# Altium PCB 1SL1 Xilinx Spartan-11E PQ208.PcbDoc (part 4 of 5)
Units mil, origin at the board's own origin, x right, y up, seen from the top; angles counter-clockwise.
Board outline 7086.61 x 1988.19 mil, 2 copper layers (Top Layer, Bottom Layer), stack 29.698 mil thick; 115 components, 126 nets, 642 pads, 225 vias.
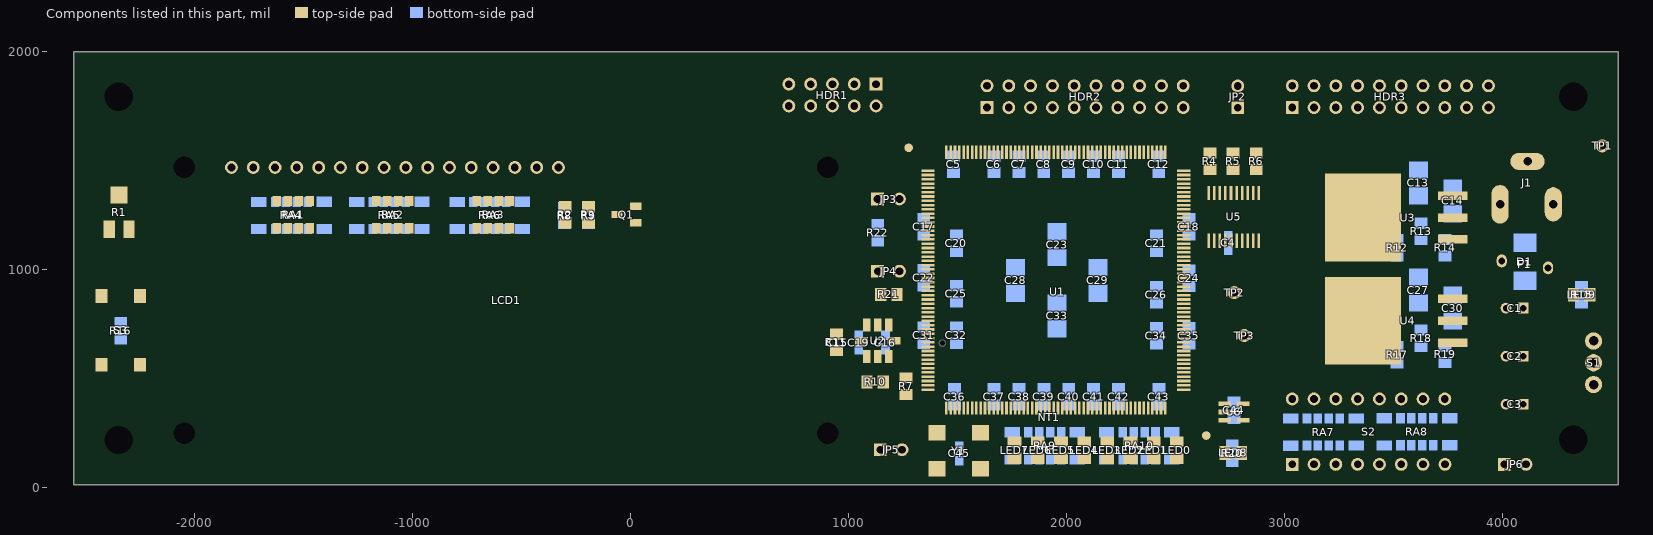
[diagram p3: the components of this part, seen from the top]

## Silkscreen, mask and mechanical layers (free items; w line width, h text height) (continued)
19_FABRICATION_NOTES:
  text "N" at 5217.99,-898.88 h2.83
  text "O" at 5219.56,-898.88 h2.83
  text "T" at 5221.13,-898.88 h2.83
  text "E" at 5222.25,-898.88 h2.83
  text "S" at 5223.37,-898.88 h2.83
  text "U" at 5224.94,-898.88 h2.83
  text "N" at 5226.51,-898.88 h2.83
  text "L" at 5228.07,-898.88 h2.83
  text "E" at 5229.2,-898.88 h2.83
  text "S" at 5230.32,-898.88 h2.83
  text "S" at 5231.44,-898.88 h2.83
  text "O" at 5233,-898.88 h2.83
  text "T" at 5234.57,-898.88 h2.83
  text "H" at 5235.69,-898.88 h2.83
  text "E" at 5237.26,-898.88 h2.83
  text "R" at 5238.38,-898.88 h2.83
  text "W" at 5239.73,-898.88 h2.83
  text "I" at 5241.97,-898.88 h2.83
  text "S" at 5242.64,-898.88 h2.83
  text "E" at 5243.76,-898.88 h2.83
  text "S" at 5245.33,-898.88 h2.83
  text "P" at 5246.45,-898.88 h2.83
  text "E" at 5247.79,-898.88 h2.83
  text "C" at 5248.91,-898.88 h2.83
  text "I" at 5250.26,-898.88 h2.83
  text "F" at 5250.93,-898.88 h2.83
  text "I" at 5252.05,-898.88 h2.83
  text "E" at 5252.72,-898.88 h2.83
  text "D" at 5253.84,-898.88 h2.83
  text ":" at 5255.41,-898.88 h2.83
  text "1" at 5220.01,-902.69 h2.83
  text "A" at 5224.49,-904.04 h2.83
  text "L" at 5225.83,-904.04 h2.83
  text "L" at 5226.95,-904.04 h2.83
  text "H" at 5228.52,-904.04 h2.83
  text "O" at 5230.09,-904.04 h2.83
  text "L" at 5231.66,-904.04 h2.83
  text "E" at 5232.78,-904.04 h2.83
  text "S" at 5233.9,-904.04 h2.83
  text "F" at 5235.47,-904.04 h2.83
  text "I" at 5236.59,-904.04 h2.83
  text "N" at 5237.26,-904.04 h2.83
  text "I" at 5238.83,-904.04 h2.83
  text "S" at 5239.5,-904.04 h2.83
  text "H" at 5240.62,-904.04 h2.83
  text "E" at 5242.19,-904.04 h2.83
  text "D" at 5243.31,-904.04 h2.83
  text "S" at 5245.32,-904.04 h2.83
  text "I" at 5246.44,-904.04 h2.83
  text "Z" at 5247.12,-904.04 h2.83
  text "E" at 5248.24,-904.04 h2.83
  text "A" at 5249.8,-904.04 h2.83
  text "S" at 5251.15,-904.04 h2.83
  text "S" at 5252.72,-904.04 h2.83
  text "H" at 5253.84,-904.04 h2.83
  text "O" at 5255.41,-904.04 h2.83
  text "W" at 5256.97,-904.04 h2.83
  text "N" at 5259.21,-904.04 h2.83
  text "." at 5260.78,-904.04 h2.83
  text "2" at 5220.01,-908.29 h2.83
  text "M" at 5224.49,-907.85 h2.83
  text "A" at 5226.5,-907.85 h2.83
  text "T" at 5227.85,-907.85 h2.83
  text "E" at 5228.97,-907.85 h2.83
  text "R" at 5230.09,-907.85 h2.83
  text "I" at 5231.43,-907.85 h2.83
  text "A" at 5232.1,-907.85 h2.83
  text "L" at 5233.45,-907.85 h2.83
  text ":" at 5234.57,-907.85 h2.83
  text "0" at 5235.69,-907.85 h2.83
  text "." at 5237.03,-907.85 h2.83
  text "0" at 5237.71,-907.85 h2.83
  text "6" at 5239.05,-907.85 h2.83
  text "2" at 5240.39,-907.85 h2.83
  text "I" at 5242.19,-907.85 h2.83
  text "N" at 5242.86,-907.85 h2.83
  text "F" at 5244.88,-907.85 h2.83
  text "I" at 5246,-907.85 h2.83
  text "B" at 5246.67,-907.85 h2.83
  text "E" at 5248.01,-907.85 h2.83
  text "R" at 5249.13,-907.85 h2.83
  text "G" at 5250.48,-907.85 h2.83
  text "L" at 5252.05,-907.85 h2.83
  text "A" at 5253.17,-907.85 h2.83
  text "S" at 5254.51,-907.85 h2.83
  text "S" at 5255.63,-907.85 h2.83
  text "R" at 5257.2,-907.85 h2.83
  text "E" at 5258.54,-907.85 h2.83
  text "I" at 5259.66,-907.85 h2.83
  text "N" at 5260.33,-907.85 h2.83
  text "F" at 5261.9,-907.85 h2.83
  text "O" at 5263.02,-907.85 h2.83
  text "R" at 5264.59,-907.85 h2.83
  text "C" at 5265.94,-907.85 h2.83
  text "E" at 5267.28,-907.85 h2.83
  text "D" at 5268.4,-907.85 h2.83
  text "E" at 5270.42,-907.85 h2.83
  text "P" at 5271.54,-907.85 h2.83
  text "O" at 5272.88,-907.85 h2.83
  text "X" at 5274.45,-907.85 h2.83
  text "Y" at 5275.79,-907.85 h2.83
  text "," at 5276.91,-907.85 h2.83
  text "N" at 5224.49,-911.21 h2.83
  text "E" at 5226.06,-911.21 h2.83
  text "M" at 5227.18,-911.21 h2.83
  text "A" at 5229.19,-911.21 h2.83
  text "G" at 5230.98,-911.21 h2.83
  text "R" at 5232.55,-911.21 h2.83
  text "A" at 5233.9,-911.21 h2.83
  text "D" at 5235.24,-911.21 h2.83
  text "E" at 5236.81,-911.21 h2.83
  text "F" at 5238.38,-911.21 h2.83
  text "R" at 5239.5,-911.21 h2.83
  text "-" at 5240.84,-911.21 h2.83
  text "4" at 5241.51,-911.21 h2.83
  text "," at 5242.86,-911.21 h2.83
  text "N" at 5243.98,-911.21 h2.83
  text "A" at 5245.55,-911.21 h2.83
  text "T" at 5246.89,-911.21 h2.83
  text "U" at 5248.01,-911.21 h2.83
  text "R" at 5249.58,-911.21 h2.83
  text "A" at 5250.92,-911.21 h2.83
  text "L" at 5252.27,-911.21 h2.83
  text "C" at 5253.84,-911.21 h2.83
  text "O" at 5255.18,-911.21 h2.83
  text "L" at 5256.75,-911.21 h2.83
  text "O" at 5257.87,-911.21 h2.83
  text "R" at 5259.44,-911.21 h2.83
  text "W" at 5261.23,-911.21 h2.83
  text "I" at 5263.47,-911.21 h2.83
  text "T" at 5264.14,-911.21 h2.83
  text "H" at 5265.26,-911.21 h2.83
  text "O" at 5266.83,-911.21 h2.83
  text "U" at 5268.4,-911.21 h2.83
  text "T" at 5269.97,-911.21 h2.83
  text "O" at 5224.49,-914.57 h2.83
  text "P" at 5226.06,-914.57 h2.83
  text "A" at 5227.4,-914.57 h2.83
  text "Q" at 5228.74,-914.57 h2.83
  text "U" at 5230.31,-914.57 h2.83
  text "E" at 5231.88,-914.57 h2.83
  text "R" at 5233,-914.57 h2.83
  text ";" at 5234.35,-914.57 h2.83
  text "1" at 5235.47,-914.57 h2.83
  text "O" at 5237.26,-914.57 h2.83
  text "Z" at 5238.83,-914.57 h2.83
  text "C" at 5240.39,-914.57 h2.83
  text "O" at 5241.74,-914.57 h2.83
  text "P" at 5243.31,-914.57 h2.83
  text "P" at 5244.65,-914.57 h2.83
  text "E" at 5246,-914.57 h2.83
  text "R" at 5247.12,-914.57 h2.83
  text "C" at 5248.91,-914.57 h2.83
  text "L" at 5250.25,-914.57 h2.83
  text "A" at 5251.37,-914.57 h2.83
  text "D" at 5252.72,-914.57 h2.83
  text "O" at 5254.73,-914.57 h2.83
  text "U" at 5256.3,-914.57 h2.83
  text "T" at 5257.87,-914.57 h2.83
  text "E" at 5258.99,-914.57 h2.83
  text "R" at 5260.11,-914.57 h2.83
  text "L" at 5261.9,-914.57 h2.83
  text "A" at 5263.02,-914.57 h2.83
  text "Y" at 5264.37,-914.57 h2.83
  text "E" at 5265.49,-914.57 h2.83
  text "R" at 5266.61,-914.57 h2.83
  text "S" at 5267.95,-914.57 h2.83
  text "." at 5269.07,-914.57 h2.83
  text "T" at 5270.19,-914.57 h2.83
  text "H" at 5271.31,-914.57 h2.83
  text "E" at 5272.88,-914.57 h2.83
  text "P" at 5224.49,-917.93 h2.83
  text "R" at 5225.83,-917.93 h2.83
  text "I" at 5227.18,-917.93 h2.83
  text "N" at 5227.85,-917.93 h2.83
  text "T" at 5229.42,-917.93 h2.83
  text "E" at 5230.54,-917.93 h2.83
  text "D" at 5231.66,-917.93 h2.83
  text "W" at 5233.67,-917.93 h2.83
  text "I" at 5235.91,-917.93 h2.83
  text "R" at 5236.59,-917.93 h2.83
  text "I" at 5237.93,-917.93 h2.83
  text "N" at 5238.6,-917.93 h2.83
  text "G" at 5240.17,-917.93 h2.83
  text "B" at 5242.19,-917.93 h2.83
  text "O" at 5243.53,-917.93 h2.83
  text "A" at 5245.1,-917.93 h2.83
  text "R" at 5246.44,-917.93 h2.83
  text "D" at 5247.79,-917.93 h2.83
  text "M" at 5249.8,-917.93 h2.83
  text "A" at 5251.82,-917.93 h2.83
  text "T" at 5253.17,-917.93 h2.83
  text "E" at 5254.29,-917.93 h2.83
  text "R" at 5255.41,-917.93 h2.83
  text "I" at 5256.75,-917.93 h2.83
  text "A" at 5257.42,-917.93 h2.83
  text "L" at 5258.77,-917.93 h2.83
  text "M" at 5260.33,-917.93 h2.83
  text "U" at 5262.35,-917.93 h2.83
  text "S" at 5263.92,-917.93 h2.83
  text "T" at 5265.04,-917.93 h2.83
  text "H" at 5266.61,-917.93 h2.83
  text "A" at 5268.18,-917.93 h2.83
  text "V" at 5269.52,-917.93 h2.83
  text "E" at 5270.87,-917.93 h2.83
  text "A" at 5272.43,-917.93 h2.83
  text "C" at 5224.49,-921.29 h2.83
  text "P" at 5225.83,-921.29 h2.83
  text "M" at 5227.18,-921.29 h2.83
  text "P" at 5229.19,-921.29 h2.83
  text "A" at 5230.54,-921.29 h2.83
  text "R" at 5231.88,-921.29 h2.83
  text "A" at 5233.22,-921.29 h2.83
  text "T" at 5234.57,-921.29 h2.83
  text "I" at 5235.69,-921.29 h2.83
  text "V" at 5236.36,-921.29 h2.83
  text "E" at 5237.71,-921.29 h2.83
  text "T" at 5239.27,-921.29 h2.83
  text "R" at 5240.39,-921.29 h2.83
  text "A" at 5241.74,-921.29 h2.83
  text "C" at 5243.08,-921.29 h2.83
  text "K" at 5244.43,-921.29 h2.83
  text "I" at 5245.77,-921.29 h2.83
  text "N" at 5246.44,-921.29 h2.83
  text "G" at 5248.01,-921.29 h2.83
  text "I" at 5250.03,-921.29 h2.83
  text "N" at 5250.7,-921.29 h2.83
  text "D" at 5252.27,-921.29 h2.83
  text "E" at 5253.84,-921.29 h2.83
  text "X" at 5254.96,-921.29 h2.83
  text "(" at 5256.75,-921.29 h2.83
  text "C" at 5257.42,-921.29 h2.83
  text "T" at 5258.77,-921.29 h2.83
  text "I" at 5259.89,-921.29 h2.83
  text ")" at 5260.56,-921.29 h2.83
  text "O" at 5261.68,-921.29 h2.83
  text "F" at 5263.25,-921.29 h2.83
  text "A" at 5264.82,-921.29 h2.83
  text "T" at 5266.16,-921.29 h2.83
  text "L" at 5267.73,-921.29 h2.83
  text "E" at 5268.85,-921.29 h2.83
  text "A" at 5269.97,-921.29 h2.83
  text "S" at 5271.31,-921.29 h2.83
  text "T" at 5272.43,-921.29 h2.83
  text "1" at 5274,-921.29 h2.83
  text "7" at 5275.35,-921.29 h2.83
  text "5" at 5276.69,-921.29 h2.83
  text "A" at 5224.49,-924.65 h2.83
  text "N" at 5225.83,-924.65 h2.83
  text "D" at 5227.4,-924.65 h2.83
  text "A" at 5229.42,-924.65 h2.83
  text "U" at 5231.21,-924.65 h2.83
  text "L" at 5232.78,-924.65 h2.83
  text "9" at 5234.35,-924.65 h2.83
  text "4" at 5235.69,-924.65 h2.83
  text "V" at 5237.03,-924.65 h2.83
  text "0" at 5238.38,-924.65 h2.83
  text "F" at 5240.17,-924.65 h2.83
  text "L" at 5241.29,-924.65 h2.83
  text "A" at 5242.41,-924.65 h2.83
  text "M" at 5243.76,-924.65 h2.83
  text "M" at 5245.77,-924.65 h2.83
  text "A" at 5247.79,-924.65 h2.83
  text "B" at 5249.13,-924.65 h2.83
  text "I" at 5250.48,-924.65 h2.83
  text "L" at 5251.15,-924.65 h2.83
  text "I" at 5252.27,-924.65 h2.83
  text "T" at 5252.94,-924.65 h2.83
  text "Y" at 5254.06,-924.65 h2.83
  text "R" at 5255.63,-924.65 h2.83
  text "A" at 5256.97,-924.65 h2.83
  text "T" at 5258.32,-924.65 h2.83
  text "I" at 5259.44,-924.65 h2.83
  text "N" at 5260.11,-924.65 h2.83
  text "G" at 5261.68,-924.65 h2.83
  text "." at 5263.25,-924.65 h2.83
  text "3" at 5220.01,-928.91 h2.83
  text "F" at 5224.49,-930.25 h2.83
  text "I" at 5225.61,-930.25 h2.83
  text "N" at 5226.28,-930.25 h2.83
  text "I" at 5227.85,-930.25 h2.83
  text "S" at 5228.52,-930.25 h2.83
  text "H" at 5229.64,-930.25 h2.83
  text ":" at 5231.21,-930.25 h2.83
  text "E" at 5232.33,-930.25 h2.83
  text "N" at 5233.45,-930.25 h2.83
  text "I" at 5235.02,-930.25 h2.83
  text "G" at 5235.69,-930.25 h2.83
  text "P" at 5237.71,-930.25 h2.83
  text "E" at 5239.05,-930.25 h2.83
  text "R" at 5240.17,-930.25 h2.83
  text "I" at 5241.96,-930.25 h2.83
  text "P" at 5242.64,-930.25 h2.83
  text "C" at 5243.98,-930.25 h2.83
  text "-" at 5245.32,-930.25 h2.83
  text "4" at 5246,-930.25 h2.83
  text "5" at 5247.34,-930.25 h2.83
  text "5" at 5248.68,-930.25 h2.83
  text "2" at 5250.03,-930.25 h2.83
  text "." at 5251.37,-930.25 h2.83
  text "A" at 5224.49,-934.06 h2.83
  text "P" at 5225.83,-934.06 h2.83
  text "P" at 5227.18,-934.06 h2.83
  text "L" at 5228.52,-934.06 h2.83
  text "Y" at 5229.64,-934.06 h2.83
  text "G" at 5231.21,-934.06 h2.83
  text "R" at 5232.78,-934.06 h2.83
  text "E" at 5234.12,-934.06 h2.83
  text "E" at 5235.24,-934.06 h2.83
  text "N" at 5236.36,-934.06 h2.83
  text "S" at 5238.38,-934.06 h2.83
  text "O" at 5239.5,-934.06 h2.83
  text "L" at 5241.07,-934.06 h2.83
  text "D" at 5242.19,-934.06 h2.83
  text "E" at 5243.76,-934.06 h2.83
  text "R" at 5244.88,-934.06 h2.83
  text "M" at 5246.67,-934.06 h2.83
  text "A" at 5248.68,-934.06 h2.83
  text "S" at 5250.03,-934.06 h2.83
  text "K" at 5251.15,-934.06 h2.83
  text "O" at 5252.94,-934.06 h2.83
  text "V" at 5254.51,-934.06 h2.83
  text "E" at 5255.85,-934.06 h2.83
  text "R" at 5256.97,-934.06 h2.83
  text "B" at 5258.77,-934.06 h2.83
  text "A" at 5260.11,-934.06 h2.83
  text "R" at 5261.46,-934.06 h2.83
  text "E" at 5262.8,-934.06 h2.83
  text "C" at 5264.37,-934.06 h2.83
  text "O" at 5265.71,-934.06 h2.83
  text "P" at 5267.28,-934.06 h2.83
  text "P" at 5268.62,-934.06 h2.83
  text "E" at 5269.97,-934.06 h2.83
  text "R" at 5271.09,-934.06 h2.83
  text "(" at 5272.88,-934.06 h2.83
  text "B" at 5273.55,-934.06 h2.83
  text "O" at 5274.9,-934.06 h2.83
  text "T" at 5276.47,-934.06 h2.83
  text "H" at 5277.59,-934.06 h2.83
  text "4" at 5220.01,-934.51 h2.83
  text "S" at 5224.49,-937.42 h2.83
  text "I" at 5225.61,-937.42 h2.83
  text "D" at 5226.28,-937.42 h2.83
  text "E" at 5227.85,-937.42 h2.83
  text "S" at 5228.97,-937.42 h2.83
  text ")" at 5230.09,-937.42 h2.83
  text "." at 5230.76,-937.42 h2.83
  text "T" at 5224.49,-941.23 h2.83
  text "O" at 5225.61,-941.23 h2.83
  text "B" at 5227.62,-941.23 h2.83
  text "E" at 5228.97,-941.23 h2.83
  text "S" at 5230.54,-941.23 h2.83
  text "I" at 5231.66,-941.23 h2.83
  text "L" at 5232.33,-941.23 h2.83
  text "K" at 5233.45,-941.23 h2.83
  text "S" at 5234.79,-941.23 h2.83
  text "C" at 5235.91,-941.23 h2.83
  text "R" at 5237.26,-941.23 h2.83
  text "E" at 5238.6,-941.23 h2.83
  text "E" at 5239.72,-941.23 h2.83
  text "N" at 5240.84,-941.23 h2.83
  text "E" at 5242.41,-941.23 h2.83
  text "D" at 5243.53,-941.23 h2.83
  text "W" at 5245.55,-941.23 h2.83
  text "H" at 5247.79,-941.23 h2.83
  text "I" at 5249.36,-941.23 h2.83
  text "T" at 5250.03,-941.23 h2.83
  text "E" at 5251.15,-941.23 h2.83
  text "O" at 5252.72,-941.23 h2.83
  text "N" at 5254.29,-941.23 h2.83
  text "(" at 5256.3,-941.23 h2.83
  text "B" at 5256.97,-941.23 h2.83
  text "O" at 5258.32,-941.23 h2.83
  text "T" at 5259.89,-941.23 h2.83
  text "H" at 5261.01,-941.23 h2.83
  text "S" at 5263.02,-941.23 h2.83
  text "I" at 5264.14,-941.23 h2.83
  text "D" at 5264.82,-941.23 h2.83
  text "E" at 5266.38,-941.23 h2.83
  text "S" at 5267.5,-941.23 h2.83
  text ")" at 5268.62,-941.23 h2.83
  text "P" at 5269.75,-941.23 h2.83
  text "E" at 5271.09,-941.23 h2.83
  text "R" at 5272.21,-941.23 h2.83
  text "5" at 5220.01,-941.68 h2.83
  text "\"" at 5224.49,-944.59 h2.83
  text "S" at 5225.38,-944.59 h2.83
  text "I" at 5226.5,-944.59 h2.83
  text "L" at 5227.18,-944.59 h2.83
  text "K" at 5228.3,-944.59 h2.83
  text "S" at 5229.64,-944.59 h2.83
  text "C" at 5230.76,-944.59 h2.83
  text "R" at 5232.1,-944.59 h2.83
  text "E" at 5233.45,-944.59 h2.83
  text "E" at 5234.57,-944.59 h2.83
  text "N" at 5235.69,-944.59 h2.83
  text "\"" at 5237.26,-944.59 h2.83
  text "A" at 5238.6,-944.59 h2.83
  text "R" at 5239.95,-944.59 h2.83
  text "T" at 5241.29,-944.59 h2.83
  text "W" at 5242.41,-944.59 h2.83
  text "O" at 5244.65,-944.59 h2.83
  text "R" at 5246.22,-944.59 h2.83
  text "K" at 5247.56,-944.59 h2.83
  text "." at 5248.91,-944.59 h2.83
  text "6" at 5220.01,-948.85 h2.83
  text "P" at 5224.49,-948.85 h2.83
  text "R" at 5225.83,-948.85 h2.83
  text "I" at 5227.18,-948.85 h2.83
  text "N" at 5227.85,-948.85 h2.83
  text "T" at 5229.42,-948.85 h2.83
  text "E" at 5230.54,-948.85 h2.83
  text "D" at 5231.66,-948.85 h2.83
  text "W" at 5233.67,-948.85 h2.83
  text "I" at 5235.91,-948.85 h2.83
  text "R" at 5236.59,-948.85 h2.83
  text "I" at 5237.93,-948.85 h2.83
  text "N" at 5238.6,-948.85 h2.83
  text "G" at 5240.17,-948.85 h2.83
  text "B" at 5242.19,-948.85 h2.83
  text "O" at 5243.53,-948.85 h2.83
  text "A" at 5245.1,-948.85 h2.83
  text "R" at 5246.44,-948.85 h2.83
  text "D" at 5247.79,-948.85 h2.83
  text "T" at 5249.8,-948.85 h2.83
  text "O" at 5250.92,-948.85 h2.83
  text "B" at 5252.94,-948.85 h2.83
  text "E" at 5254.29,-948.85 h2.83
  text "E" at 5255.85,-948.85 h2.83
  text "L" at 5256.97,-948.85 h2.83
  text "E" at 5258.09,-948.85 h2.83
  text "C" at 5259.21,-948.85 h2.83
  text "T" at 5260.56,-948.85 h2.83
  text "R" at 5261.68,-948.85 h2.83
  text "I" at 5263.02,-948.85 h2.83
  text "C" at 5263.7,-948.85 h2.83
  text "A" at 5265.04,-948.85 h2.83
  text "L" at 5266.38,-948.85 h2.83
  text "L" at 5267.5,-948.85 h2.83
  text "Y" at 5268.62,-948.85 h2.83
  text "T" at 5270.19,-948.85 h2.83
  text "E" at 5271.31,-948.85 h2.83
  text "S" at 5272.43,-948.85 h2.83
  text "T" at 5273.55,-948.85 h2.83
  text "E" at 5274.67,-948.85 h2.83
  text "D" at 5275.79,-948.85 h2.83
  text "B" at 5224.49,-952.21 h2.83
  text "Y" at 5225.83,-952.21 h2.83
  text "F" at 5227.4,-952.21 h2.83
  text "A" at 5228.52,-952.21 h2.83
  text "B" at 5229.86,-952.21 h2.83
  text "R" at 5231.21,-952.21 h2.83
  text "I" at 5232.55,-952.21 h2.83
  text "C" at 5233.22,-952.21 h2.83
  text "A" at 5234.57,-952.21 h2.83
  text "T" at 5235.91,-952.21 h2.83
  text "O" at 5237.03,-952.21 h2.83
  text "R" at 5238.6,-952.21 h2.83
  text "F" at 5240.39,-952.21 h2.83
  text "O" at 5241.51,-952.21 h2.83
  text "R" at 5243.08,-952.21 h2.83
  text "T" at 5244.88,-952.21 h2.83
  text "R" at 5246,-952.21 h2.83
  text "A" at 5247.34,-952.21 h2.83
  text "C" at 5248.68,-952.21 h2.83
  text "E" at 5250.03,-952.21 h2.83
  text "C" at 5251.6,-952.21 h2.83
  text "O" at 5252.94,-952.21 h2.83
  text "N" at 5254.51,-952.21 h2.83
  text "T" at 5256.08,-952.21 h2.83
  text "I" at 5257.2,-952.21 h2.83
  text "N" at 5257.87,-952.21 h2.83
  text "U" at 5259.44,-952.21 h2.83
  text "I" at 5261.01,-952.21 h2.83
  text "T" at 5261.68,-952.21 h2.83
  text "Y" at 5262.8,-952.21 h2.83
  text "A" at 5264.37,-952.21 h2.83
  text "N" at 5265.71,-952.21 h2.83
  text "D" at 5267.28,-952.21 h2.83
  text "P" at 5269.3,-952.21 h2.83
  text "R" at 5270.64,-952.21 h2.83
  text "O" at 5271.99,-952.21 h2.83
  text "O" at 5273.55,-952.21 h2.83
  text "F" at 5275.12,-952.21 h2.83
  text "A" at 5224.49,-955.57 h2.83
  text "G" at 5225.83,-955.57 h2.83
  text "A" at 5227.4,-955.57 h2.83
  text "I" at 5228.74,-955.57 h2.83
  text "N" at 5229.42,-955.57 h2.83
  text "S" at 5230.98,-955.57 h2.83
  text "T" at 5232.1,-955.57 h2.83
  text "T" at 5233.67,-955.57 h2.83
  text "R" at 5234.79,-955.57 h2.83
  text "A" at 5236.14,-955.57 h2.83
  text "C" at 5237.48,-955.57 h2.83
  text "E" at 5238.83,-955.57 h2.83
  text "S" at 5240.39,-955.57 h2.83
  text "H" at 5241.51,-955.57 h2.83
  text "O" at 5243.08,-955.57 h2.83
  text "R" at 5244.65,-955.57 h2.83
  text "T" at 5246,-955.57 h2.83
  text "S" at 5247.12,-955.57 h2.83
  text "." at 5248.24,-955.57 h2.83
  text "7" at 5220.01,-958.93 h2.83
  text "A" at 5224.49,-960.27 h2.83
  text "L" at 5225.83,-960.27 h2.83
  text "L" at 5226.95,-960.27 h2.83
  text "R" at 5228.52,-960.27 h2.83
  text "A" at 5229.86,-960.27 h2.83
  text "D" at 5231.21,-960.27 h2.83
  text "I" at 5232.78,-960.27 h2.83
  text "U" at 5233.45,-960.27 h2.83
  text "S" at 5235.02,-960.27 h2.83
  text "0" at 5236.59,-960.27 h2.83
  text "." at 5237.93,-960.27 h2.83
  text "0" at 5238.6,-960.27 h2.83
  text "4" at 5239.95,-960.27 h2.83
  text "7" at 5241.29,-960.27 h2.83
  text "U" at 5243.08,-960.27 h2.83
  text "N" at 5244.65,-960.27 h2.83
  text "L" at 5246.22,-960.27 h2.83
  text "E" at 5247.34,-960.27 h2.83
  text "S" at 5248.46,-960.27 h2.83
  text "S" at 5249.58,-960.27 h2.83
  text "O" at 5251.15,-960.27 h2.83
  text "T" at 5252.72,-960.27 h2.83
  text "H" at 5253.84,-960.27 h2.83
  text "E" at 5255.41,-960.27 h2.83
  text "R" at 5256.53,-960.27 h2.83
  text "W" at 5257.87,-960.27 h2.83
  text "I" at 5260.11,-960.27 h2.83
  text "S" at 5260.78,-960.27 h2.83
  text "E" at 5261.9,-960.27 h2.83
  text "N" at 5263.47,-960.27 h2.83
  text "O" at 5265.04,-960.27 h2.83
  text "T" at 5266.61,-960.27 h2.83
  text "E" at 5267.73,-960.27 h2.83
  text "D" at 5268.85,-960.27 h2.83
  text "." at 5270.42,-960.27 h2.83
  text "F" at 5224.49,-964.08 h2.83
  text "A" at 5225.61,-964.08 h2.83
  text "B" at 5226.95,-964.08 h2.83
  text "R" at 5228.3,-964.08 h2.83
  text "I" at 5229.64,-964.08 h2.83
  text "C" at 5230.31,-964.08 h2.83
  text "A" at 5231.66,-964.08 h2.83
  text "T" at 5233,-964.08 h2.83
  text "O" at 5234.12,-964.08 h2.83
  text "R" at 5235.69,-964.08 h2.83
  text "S" at 5237.48,-964.08 h2.83
  text "H" at 5238.6,-964.08 h2.83
  text "A" at 5240.17,-964.08 h2.83
  text "L" at 5241.51,-964.08 h2.83
  text "L" at 5242.64,-964.08 h2.83
  text "A" at 5244.2,-964.08 h2.83
  text "P" at 5245.55,-964.08 h2.83
  text "P" at 5246.89,-964.08 h2.83
  text "L" at 5248.24,-964.08 h2.83
  text "Y" at 5249.36,-964.08 h2.83
  text "D" at 5250.92,-964.08 h2.83
  text "A" at 5252.49,-964.08 h2.83
  text "T" at 5253.84,-964.08 h2.83
  text "E" at 5254.96,-964.08 h2.83
  text "C" at 5256.53,-964.08 h2.83
  text "O" at 5257.87,-964.08 h2.83
  text "D" at 5259.44,-964.08 h2.83
  text "E" at 5261.01,-964.08 h2.83
  text "," at 5262.13,-964.08 h2.83
  text "F" at 5263.25,-964.08 h2.83
  text "A" at 5264.37,-964.08 h2.83
  text "B" at 5265.71,-964.08 h2.83
  text "R" at 5267.06,-964.08 h2.83
  text "I" at 5268.4,-964.08 h2.83
  text "C" at 5269.07,-964.08 h2.83
  text "A" at 5270.42,-964.08 h2.83
  text "T" at 5271.76,-964.08 h2.83
  text "O" at 5272.88,-964.08 h2.83
  text "R" at 5274.45,-964.08 h2.83
  text "'" at 5275.79,-964.08 h2.83
  text "S" at 5276.24,-964.08 h2.83
  text "8" at 5220.01,-964.53 h2.83
  text "C" at 5224.49,-967.44 h2.83
  text "A" at 5225.83,-967.44 h2.83
  text "N" at 5227.18,-967.44 h2.83
  text "G" at 5228.74,-967.44 h2.83
  text "C" at 5230.76,-967.44 h2.83
  text "O" at 5232.1,-967.44 h2.83
  text "D" at 5233.67,-967.44 h2.83
  text "E" at 5235.24,-967.44 h2.83
  text "A" at 5236.81,-967.44 h2.83
  text "N" at 5238.15,-967.44 h2.83
  text "D" at 5239.72,-967.44 h2.83
  text "U" at 5241.74,-967.44 h2.83
  text "L" at 5243.31,-967.44 h2.83
  text "M" at 5244.88,-967.44 h2.83
  text "A" at 5246.89,-967.44 h2.83
  text "R" at 5248.24,-967.44 h2.83
  text "K" at 5249.58,-967.44 h2.83
  text "I" at 5250.92,-967.44 h2.83
  text "N" at 5251.6,-967.44 h2.83
  text "G" at 5253.17,-967.44 h2.83
  text "T" at 5255.18,-967.44 h2.83
  text "O" at 5256.3,-967.44 h2.83
  text "S" at 5258.32,-967.44 h2.83
  text "E" at 5259.44,-967.44 h2.83
  text "C" at 5260.56,-967.44 h2.83
  text "O" at 5261.9,-967.44 h2.83
  text "N" at 5263.47,-967.44 h2.83
  text "D" at 5265.04,-967.44 h2.83
  text "A" at 5266.61,-967.44 h2.83
  text "R" at 5267.95,-967.44 h2.83
  text "Y" at 5269.3,-967.44 h2.83
  text "S" at 5270.87,-967.44 h2.83
  text "I" at 5271.99,-967.44 h2.83
  text "D" at 5272.66,-967.44 h2.83
  text "E" at 5274.23,-967.44 h2.83
  text "W" at 5224.49,-970.8 h2.83
  text "H" at 5226.73,-970.8 h2.83
  text "E" at 5228.3,-970.8 h2.83
  text "R" at 5229.42,-970.8 h2.83
  text "E" at 5230.76,-970.8 h2.83
  text "I" at 5232.33,-970.8 h2.83
  text "N" at 5233,-970.8 h2.83
  text "D" at 5234.57,-970.8 h2.83
  text "I" at 5236.14,-970.8 h2.83
  text "C" at 5236.81,-970.8 h2.83
  text "A" at 5238.15,-970.8 h2.83
  text "T" at 5239.5,-970.8 h2.83
  text "E" at 5240.62,-970.8 h2.83
  text "D" at 5241.74,-970.8 h2.83
  text "." at 5243.31,-970.8 h2.83
  text "M" at 5244.43,-970.8 h2.83
  text "A" at 5246.44,-970.8 h2.83
  text "R" at 5247.79,-970.8 h2.83
  text "K" at 5249.13,-970.8 h2.83
  text "I" at 5250.48,-970.8 h2.83
  text "N" at 5251.15,-970.8 h2.83
  text "G" at 5252.72,-970.8 h2.83
  text "T" at 5254.73,-970.8 h2.83
  text "O" at 5255.85,-970.8 h2.83
  text "B" at 5257.87,-970.8 h2.83
  text "E" at 5259.21,-970.8 h2.83
  text "C" at 5260.78,-970.8 h2.83
  text "O" at 5262.13,-970.8 h2.83
  text "P" at 5263.7,-970.8 h2.83
  text "P" at 5265.04,-970.8 h2.83
  text "E" at 5266.38,-970.8 h2.83
  text "R" at 5267.5,-970.8 h2.83
  text "E" at 5269.3,-970.8 h2.83
  text "T" at 5270.42,-970.8 h2.83
  text "C" at 5271.54,-970.8 h2.83
  text "H" at 5272.88,-970.8 h2.83
  text "E" at 5274.45,-970.8 h2.83
  text "D" at 5275.57,-970.8 h2.83
  text "." at 5277.14,-970.8 h2.83
  text "9" at 5220.01,-975.06 h2.83
  text "F" at 5224.49,-974.61 h2.83
  text "A" at 5225.61,-974.61 h2.83
  text "B" at 5226.95,-974.61 h2.83
  text "R" at 5228.3,-974.61 h2.83
  text "I" at 5229.64,-974.61 h2.83
  text "C" at 5230.31,-974.61 h2.83
  text "A" at 5231.66,-974.61 h2.83
  text "T" at 5233,-974.61 h2.83
  text "O" at 5234.12,-974.61 h2.83
  text "R" at 5235.69,-974.61 h2.83
  text "S" at 5237.48,-974.61 h2.83
  text "H" at 5238.6,-974.61 h2.83
  text "A" at 5240.17,-974.61 h2.83
  text "L" at 5241.51,-974.61 h2.83
  text "L" at 5242.64,-974.61 h2.83
  text "A" at 5244.2,-974.61 h2.83
  text "P" at 5245.55,-974.61 h2.83
  text "P" at 5246.89,-974.61 h2.83
  text "L" at 5248.24,-974.61 h2.83
  text "Y" at 5249.36,-974.61 h2.83
  text "C" at 5250.92,-974.61 h2.83
  text "O" at 5252.27,-974.61 h2.83
  text "U" at 5253.84,-974.61 h2.83
  text "N" at 5255.41,-974.61 h2.83
  text "T" at 5256.97,-974.61 h2.83
  text "R" at 5258.09,-974.61 h2.83
  text "Y" at 5259.44,-974.61 h2.83
  text "O" at 5261.01,-974.61 h2.83
  text "F" at 5262.58,-974.61 h2.83
  text "O" at 5264.14,-974.61 h2.83
  text "R" at 5265.71,-974.61 h2.83
  text "I" at 5267.06,-974.61 h2.83
  text "G" at 5267.73,-974.61 h2.83
  text "I" at 5269.3,-974.61 h2.83
  text "N" at 5269.97,-974.61 h2.83
  text "M" at 5224.49,-977.97 h2.83
  text "A" at 5226.5,-977.97 h2.83
  text "R" at 5227.85,-977.97 h2.83
  text "K" at 5229.19,-977.97 h2.83
  text "I" at 5230.54,-977.97 h2.83
  text "N" at 5231.21,-977.97 h2.83
  text "G" at 5232.78,-977.97 h2.83
  text "T" at 5234.79,-977.97 h2.83
  text "O" at 5235.91,-977.97 h2.83
  text "P" at 5237.93,-977.97 h2.83
  text "R" at 5239.27,-977.97 h2.83
  text "I" at 5240.62,-977.97 h2.83
  text "M" at 5241.29,-977.97 h2.83
  text "A" at 5243.31,-977.97 h2.83
  text "R" at 5244.65,-977.97 h2.83
  text "Y" at 5246,-977.97 h2.83
  text "A" at 5247.56,-977.97 h2.83
  text "N" at 5248.91,-977.97 h2.83
  text "D" at 5250.48,-977.97 h2.83
  text "S" at 5252.49,-977.97 h2.83
  text "E" at 5253.61,-977.97 h2.83
  text "C" at 5254.73,-977.97 h2.83
  text "O" at 5256.08,-977.97 h2.83
  text "N" at 5257.65,-977.97 h2.83
  text "D" at 5259.21,-977.97 h2.83
  text "A" at 5260.78,-977.97 h2.83
  text "R" at 5262.13,-977.97 h2.83
  text "Y" at 5263.47,-977.97 h2.83
  text "S" at 5265.04,-977.97 h2.83
  text "I" at 5266.16,-977.97 h2.83
  text "D" at 5266.83,-977.97 h2.83
  text "E" at 5268.4,-977.97 h2.83
  text "W" at 5269.97,-977.97 h2.83
  text "H" at 5272.21,-977.97 h2.83
  text "E" at 5273.78,-977.97 h2.83
  text "R" at 5274.9,-977.97 h2.83
  text "E" at 5276.24,-977.97 h2.83
  text "I" at 5224.49,-981.33 h2.83
  text "N" at 5225.16,-981.33 h2.83
  text "D" at 5226.73,-981.33 h2.83
  text "I" at 5228.3,-981.33 h2.83
  text "C" at 5228.97,-981.33 h2.83
  text "A" at 5230.31,-981.33 h2.83
  text "T" at 5231.66,-981.33 h2.83
  text "E" at 5232.78,-981.33 h2.83
  text "D" at 5233.9,-981.33 h2.83
  text "." at 5235.47,-981.33 h2.83
  text "M" at 5236.59,-981.33 h2.83
  text "A" at 5238.6,-981.33 h2.83
  text "R" at 5239.95,-981.33 h2.83
  text "K" at 5241.29,-981.33 h2.83
  text "I" at 5242.64,-981.33 h2.83
  text "N" at 5243.31,-981.33 h2.83
  text "G" at 5244.88,-981.33 h2.83
  text "T" at 5246.89,-981.33 h2.83
  text "O" at 5248.01,-981.33 h2.83
  text "B" at 5250.03,-981.33 h2.83
  text "E" at 5251.37,-981.33 h2.83
  text "I" at 5252.94,-981.33 h2.83
  text "N" at 5253.61,-981.33 h2.83
  text "S" at 5255.63,-981.33 h2.83
  text "I" at 5256.75,-981.33 h2.83
  text "L" at 5257.42,-981.33 h2.83
  text "K" at 5258.54,-981.33 h2.83
  text "S" at 5259.89,-981.33 h2.83
  text "C" at 5261.01,-981.33 h2.83
  text "R" at 5262.35,-981.33 h2.83
  text "E" at 5263.7,-981.33 h2.83
  text "E" at 5264.82,-981.33 h2.83
  text "N" at 5265.94,-981.33 h2.83
  text "." at 5267.5,-981.33 h2.83
20_ASSEMBLY_NOTES:
  lines w7.87: 768.56,-246.03 768.56,-320.83 843.36,-246.03 870.13,-246.03 ; 846.51,-320.83 921.31,-246.03 ; 925.25,-320.83 1000.06,-246.03 ; 1003.99,-320.83 1078.8,-246.03 ; 1082.73,-320.83 1157.54,-246.03 ; 1161.47,-320.83 1250.24,-232.44
  lines w8: 768.56,-320.83 1173.28,-320.83 1173.28,-415.32 1303.2,-285.4 1173.28,-155.48 1173.28,-246.03 768.56,-246.03
  text "BOARD TRAVEL" at 655.96,-509.42 h59.06
21_TITLE_BLOCK:
  drawing of 113 lines, arcs and shapes, not listed
  text "DWG. NO." at 6155.1,6215 h30
  text "REV:" at 7165.1,6215 h30
  text "6" at -4018.66,6170 h70
  text "5" at -1523,6170 h70
  text "4" at 966.34,6170 h70
  text "3" at 3473.01,6170 h70
  text "2" at 5972,6170 h70
  text "1" at 8477,6170 h70
  text ".PCB_DWG_NO" at 6370,6125 h50
  text ".PCB_REV" at 7180,6125 h50
  text "T" at -5038,6027.61 h76
  text "H" at -4994.66,6027.61 h76
  text "I" at -4944.64,6027.61 h76
  text "S" at -4924.64,6027.61 h76
  text "D" at -4859.62,6027.61 h76
  text "O" at -4809.61,6027.61 h76
  text "C" at -4754.6,6027.61 h76
  text "U" at -4704.59,6027.61 h76
  text "M" at -4654.57,6027.61 h76
  text "E" at -4596.23,6027.61 h76
  text "N" at -4549.55,6027.61 h76
  text "T" at -4501.2,6027.61 h76
  text "A" at -4437.85,6027.61 h76
  text "N" at -4391.17,6027.61 h76
  text "D" at -4341.16,6027.61 h76
  text "T" at -4272.81,6027.61 h76
  text "H" at -4229.47,6027.61 h76
  text "E" at -4179.46,6027.61 h76
  text "D" at -4114.44,6027.61 h76
  text "A" at -4064.43,6027.61 h76
  text "T" at -4017.75,6027.61 h76
  text "A" at -3976.07,6027.61 h76
  text "D" at -3909.39,6027.61 h76
  text "I" at -3859.38,6027.61 h76
  text "S" at -3841.04,6027.61 h76
  text "C" at -3794.36,6027.61 h76
  text "L" at -3744.35,6027.61 h76
  text "O" at -3706.01,6027.61 h76
  text "S" at -3650.99,6027.61 h76
  text "E" at -3604.31,6027.61 h76
  text "D" at -3557.64,6027.61 h76
  text "H" at -3489.29,6027.61 h76
  text "E" at -3439.27,6027.61 h76
  text "R" at -3392.6,6027.61 h76
  text "E" at -3344.25,6027.61 h76
  text "I" at -3297.57,6027.61 h76
  text "N" at -3277.57,6027.61 h76
  text "O" at -3209.22,6027.61 h76
  text "R" at -3154.2,6027.61 h76
  text "REVISIONS" at 7390,5995 h60
  text "H" at -5038,5947.59 h76
  text "E" at -4987.99,5947.59 h76
  text "R" at -4941.31,5947.59 h76
  text "E" at -4891.3,5947.59 h76
  text "W" at -4846.29,5947.59 h76
  text "I" at -4777.94,5947.59 h76
  text "T" at -4759.6,5947.59 h76
  text "H" at -4716.25,5947.59 h76
  text "I" at -4647.9,5947.59 h76
  text "S" at -4627.9,5947.59 h76
  text "T" at -4562.88,5947.59 h76
  text "H" at -4519.54,5947.59 h76
  text "E" at -4469.53,5947.59 h76
  text "P" at -4404.51,5947.59 h76
  text "R" at -4357.83,5947.59 h76
  text "O" at -4307.82,5947.59 h76
  text "P" at -4253.77,5947.59 h76
  text "E" at -4207.1,5947.59 h76
  text "R" at -4160.42,5947.59 h76
  text "T" at -4112.07,5947.59 h76
  text "Y" at -4068.73,5947.59 h76
  text "O" at -4003.71,5947.59 h76
  text "F" at -3950.37,5947.59 h76
  text "A" at -3887.02,5947.59 h76
  text "L" at -3840.34,5947.59 h76
  text "T" at -3803.66,5947.59 h76
  text "I" at -3760.32,5947.59 h76
  text "U" at -3740.31,5947.59 h76
  text "M" at -3690.3,5947.59 h76
  text "L" at -3613.62,5947.59 h76
  text "I" at -3575.27,5947.59 h76
  text "M" at -3555.27,5947.59 h76
  text "I" at -3498.59,5947.59 h76
  text "T" at -3478.58,5947.59 h76
  text "E" at -3435.24,5947.59 h76
  text "D" at -3388.56,5947.59 h76
  text "A" at -3320.21,5947.59 h76
  text "N" at -3273.53,5947.59 h76
  text "D" at -3223.52,5947.59 h76
  text "M" at -3153.5,5947.59 h76
  text "A" at -3095.15,5947.59 h76
  text "Y" at -3050.14,5947.59 h76
  text "ZONE" at 5805,5870 h60
  text "REV" at 6135,5870 h60
  text "DATE" at 8555,5870 h60
  text "B" at -5038,5867.57 h76
  text "E" at -4991.32,5867.57 h76
  text "F" at -4924.64,5867.57 h76
  text "R" at -4881.3,5867.57 h76
  text "E" at -4831.28,5867.57 h76
  text "E" at -4786.27,5867.57 h76
  text "L" at -4739.59,5867.57 h76
  text "Y" at -4701.25,5867.57 h76
  text "D" at -4634.57,5867.57 h76
  text "I" at -4584.56,5867.57 h76
  text "S" at -4566.22,5867.57 h76
  text "T" at -4519.54,5867.57 h76
  text "R" at -4476.89,5867.57 h76
  text "I" at -4428.54,5867.57 h76
  text "B" at -4408.54,5867.57 h76
  text "U" at -4361.86,5867.57 h76
  text "T" at -4311.85,5867.57 h76
  text "E" at -4268.5,5867.57 h76
  text "D" at -4221.82,5867.57 h76
  text "I" at -4153.47,5867.57 h76
  text "N" at -4133.47,5867.57 h76
  text "W" at -4066.79,5867.57 h76
  text "H" at -3998.44,5867.57 h76
  text "O" at -3950.09,5867.57 h76
  text "L" at -3895.08,5867.57 h76
  text "E" at -3856.73,5867.57 h76
  text "." at -3810.06,5867.57 h76
  text "N" at -3771.71,5867.57 h76
  text "O" at -3721.7,5867.57 h76
  text "R" at -3646.68,5867.57 h76
  text "I" at -3598.34,5867.57 h76
  text "G" at -3578.33,5867.57 h76
  text "H" at -3523.32,5867.57 h76
  text "T" at -3474.97,5867.57 h76
  text "S" at -3431.63,5867.57 h76
  text "A" at -3366.61,5867.57 h76
  text "R" at -3319.94,5867.57 h76
  text "E" at -3269.92,5867.57 h76
  text "DESCRIPTION" at 7150,5865 h60
  text "APPROVED" at 9060,5865 h60
  text "R" at -5038,5787.55 h76
  text "E" at -4987.99,5787.55 h76
  text "S" at -4941.31,5787.55 h76
  text "E" at -4894.63,5787.55 h76
  text "R" at -4847.95,5787.55 h76
  text "V" at -4797.94,5787.55 h76
  text "E" at -4751.26,5787.55 h76
  text "D" at -4704.59,5787.55 h76
  text "O" at -4636.24,5787.55 h76
  text "R" at -4581.22,5787.55 h76
  text "E" at -4511.2,5787.55 h76
  text "X" at -4464.53,5787.55 h76
  text "P" at -4419.52,5787.55 h76
  text "R" at -4372.84,5787.55 h76
  text "E" at -4322.82,5787.55 h76
  text "S" at -4276.15,5787.55 h76
  text "S" at -4229.47,5787.55 h76
  text "O" at -4164.45,5787.55 h76
  text "R" at -4109.44,5787.55 h76
  text "I" at -4041.09,5787.55 h76
  text "M" at -4021.08,5787.55 h76
  text "P" at -3962.74,5787.55 h76
  text "L" at -3916.06,5787.55 h76
  text "I" at -3879.38,5787.55 h76
  text "E" at -3859.38,5787.55 h76
  text "D" at -3812.7,5787.55 h76
  text "W" at -3746.02,5787.55 h76
  text "A" at -3677.67,5787.55 h76
  text "R" at -3630.99,5787.55 h76
  text "A" at -3580.98,5787.55 h76
  text "N" at -3534.3,5787.55 h76
  text "T" at -3485.95,5787.55 h76
  text "E" at -3442.61,5787.55 h76
  text "E" at -3395.93,5787.55 h76
  text "G" at -3334.68,5787.55 h76
  text "I" at -3279.67,5787.55 h76
  text "V" at -3259.66,5787.55 h76
  text "E" at -3212.98,5787.55 h76
  text "N" at -3166.3,5787.55 h76
  text "." at -3117.96,5787.55 h76
  text "A" at 6165,5735 h60
  text "ORIGINAL" at 7225,5735 h60
  text "D" at -5175,5027 h70
  text "D" at 9625,5027 h70
  text "C" at -5175,2647 h70
  text "C" at 9625,2647 h70
  text "B" at -5175,272 h70
  text "B" at 9625,272 h70
  text "DWG. NO." at 9665,-325.1 h30 r270
  text ".PCB_DWG_NO" at 9575,-540 h50 r270
  text "Altium Advanced Training: '.Pcb_File_Name_No_Path'" at -2585,-551.68 h100
  text "REV:" at 9665,-1335.1 h30 r270
  text ".PCB_REV" at 9575,-1350 h50 r270
  text "PART NO." at 3600,-1390 h45
  text ".PCB_PART_NUMBER" at 3915,-1390 h45
  text "UNLESS OTHERWISE SPECIFIED DIMENSIONS" at 3620,-1495 h45
  text "APPROVALS" at 5276,-1497.1 h45
  text "DATE" at 6136,-1497.1 h45
  text "2175 SALK AVENUE" at 8355,-1500 h45
  text "AND TOLERANCE ARE IN INCHES AND" at 3675,-1570 h45
  text "DESIGNER:" at 4956,-1577.1 h45
  text "SUITE 200" at 8355,-1590 h45
  text "APPLY TO THE FINISHED PART" at 3785,-1640 h45
  text ".PCB_DESIGNER" at 5276,-1657.1 h60
  text ".PCB_DESIGNER_APP_DATE" at 6006,-1657.1 h50
  text "CARLSBAD, CA 92008" at 8355,-1680.01 h45
  text "TOLERANCE ON:" at 4025,-1765 h45
  text "USA" at 8355,-1770 h45
  text "ENGINEER:" at 4956,-1777.1 h45
  text ".PCB_ENGINEER_APP_DATE" at 6006,-1847.1 h50
  text "2 DEC. PLACE" at 3620,-1855 h40
  text "3 DEC. PLACE" at 4075,-1855 h40
  text "ANGLES" at 4610,-1855 h40
  text ".PCB_ENGINEER" at 5276,-1857.1 h60
  text "TITLE:" at 6470,-1875 h45
  text "CHECKER:" at 4956,-1977.1 h45
  text ".PCB_2_DEC_TOL" at 3675,-2010 h60
  text ".PCB_3_DEC_TOL" at 4110,-2010 h60
  text ".PCB_ANG_TOL" at 4575,-2010 h60
  text ".PCB_TITLE_1" at 6645,-2025 h100
  text ".PCB_CHECKER_APP_DATE" at 6004,-2051.1 h50
  text ".PCB_CHECKER" at 5276,-2057.1 h60
  text "THIRD ANGLE PROJECTION" at 2847,-2070.1 h40
  text "A" at -5175,-2098 h70
  text "A" at 9625,-2098 h70
  text "MATERIAL:" at 3620,-2153.1 h45
  text "REFERENCE DOCUMENTS" at 5336,-2197.1 h45
  text "BOM:" at 4956,-2297.1 h45
  text ".PCB_TITLE_2" at 6640,-2320 h100
  text "SEE NOTES" at 3986,-2352.1 h60
  text ".DOC_NO_BOM" at 5276,-2387.1 h60
  text "ASSY DWG:" at 4956,-2487.1 h45
  text ".DOC_NO_ASSY_DWG" at 5276,-2577.1 h60
  text "SIZE:" at 6530,-2610 h45
  text "CAGE CODE:" at 6775,-2610 h45
  text "DWG NO:" at 7775,-2610 h45
  text "REV:" at 9335,-2610 h45
  text "FAB DWG:" at 4956,-2677.1 h45
  text ".PCB_DWG_NO" at 8085,-2750 h100
  text "B" at 6570,-2755 h100
  text ".PCB_REV" at 9365,-2755 h100
  text ".DOC_NO_FAB_DWG" at 5276,-2762.1 h60
  text ".CAGE_CODE" at 6945,-2765 h100
  text "SCHEMATIC:" at 4956,-2867.1 h45
  text "PRINT DATE:" at 3612,-2868.1 h45
  text "SCALE:" at 6470,-2925 h45
  text "FILE NAME:" at 7075,-2925.1 h45
  text "SHEET:" at 8815,-2925.1 h45
  text ".PRINT_DATE" at 4020,-2937.1 h60
  text ".Printout_Name" at -4994,-2947 h150
  text ".DOC_NO_SCH_DWG" at 5276,-2957.1 h60
  text ".PCB_FILE_NAME_NO_PATH" at 7418,-2970.1 h60
  text ".PCB_SCALE" at 6740,-2975 h60
  text "OF" at 9265,-2975.1 h45
  text "DOC-104 REV A" at -5050,-3042.1 h20
  text "6" at -4018.66,-3130 h70
  text "5" at -1523,-3130 h70
  text "4" at 966.34,-3130 h70
  text "3" at 3473.01,-3130 h70
  text "2" at 5972,-3130 h70
  text "1" at 8477,-3130 h70
22_TITLE_BLOCK_MIRRORED:
  drawing of 113 lines, arcs and shapes, not listed
  text "REV:" at -2665.1,6215 h30
  text "DWG. NO." at -1655.1,6215 h30
  text "1" at -3977,6170 h70
  text "2" at -1472,6170 h70
  text "3" at 1026.99,6170 h70
  text "4" at 3533.66,6170 h70
  text "5" at 6023,6170 h70
  text "6" at 8518.66,6170 h70
  text ".PCB_REV" at -2680,6125 h50
  text ".PCB_DWG_NO" at -1870,6125 h50
  text "R" at 7654.2,6027.61 h76
  text "O" at 7709.22,6027.61 h76
  text "N" at 7777.57,6027.61 h76
  text "I" at 7797.57,6027.61 h76
  text "E" at 7844.25,6027.61 h76
  text "R" at 7892.59,6027.61 h76
  text "E" at 7939.27,6027.61 h76
  text "H" at 7989.29,6027.61 h76
  text "D" at 8057.64,6027.61 h76
  text "E" at 8104.31,6027.61 h76
  text "S" at 8150.99,6027.61 h76
  text "O" at 8206.01,6027.61 h76
  text "L" at 8244.35,6027.61 h76
  text "C" at 8294.36,6027.61 h76
  text "S" at 8341.04,6027.61 h76
  text "I" at 8359.38,6027.61 h76
  text "D" at 8409.39,6027.61 h76
  text "A" at 8476.07,6027.61 h76
  text "T" at 8517.75,6027.61 h76
  text "A" at 8564.43,6027.61 h76
  text "D" at 8614.44,6027.61 h76
  text "E" at 8679.45,6027.61 h76
  text "H" at 8729.47,6027.61 h76
  text "T" at 8772.81,6027.61 h76
  text "D" at 8841.16,6027.61 h76
  text "N" at 8891.17,6027.61 h76
  text "A" at 8937.85,6027.61 h76
  text "T" at 9001.2,6027.61 h76
  text "N" at 9049.55,6027.61 h76
  text "E" at 9096.22,6027.61 h76
  text "M" at 9154.57,6027.61 h76
  text "U" at 9204.58,6027.61 h76
  text "C" at 9254.6,6027.61 h76
  text "O" at 9309.61,6027.61 h76
  text "D" at 9359.62,6027.61 h76
  text "S" at 9424.64,6027.61 h76
  text "I" at 9444.64,6027.61 h76
  text "H" at 9494.66,6027.61 h76
  text "T" at 9538,6027.61 h76
  text "REVISIONS" at -2890,5995 h60
  text "Y" at 7550.14,5947.59 h76
  text "A" at 7595.15,5947.59 h76
  text "M" at 7653.5,5947.59 h76
  text "D" at 7723.52,5947.59 h76
  text "N" at 7773.53,5947.59 h76
  text "A" at 7820.21,5947.59 h76
  text "D" at 7888.56,5947.59 h76
  text "E" at 7935.24,5947.59 h76
  text "T" at 7978.58,5947.59 h76
  text "I" at 7998.59,5947.59 h76
  text "M" at 8055.27,5947.59 h76
  text "I" at 8075.27,5947.59 h76
  text "L" at 8113.61,5947.59 h76
  text "M" at 8190.3,5947.59 h76
  text "U" at 8240.31,5947.59 h76
  text "I" at 8260.32,5947.59 h76
  text "T" at 8303.66,5947.59 h76
  text "L" at 8340.34,5947.59 h76
  text "A" at 8387.02,5947.59 h76
  text "F" at 8450.36,5947.59 h76
  text "O" at 8503.71,5947.59 h76
  text "Y" at 8568.73,5947.59 h76
  text "T" at 8612.07,5947.59 h76
  text "R" at 8660.42,5947.59 h76
  text "E" at 8707.09,5947.59 h76
  text "P" at 8753.77,5947.59 h76
  text "O" at 8807.82,5947.59 h76
  text "R" at 8857.83,5947.59 h76
  text "P" at 8904.51,5947.59 h76
  text "E" at 8969.53,5947.59 h76
  text "H" at 9019.54,5947.59 h76
  text "T" at 9062.88,5947.59 h76
  text "S" at 9127.9,5947.59 h76
  text "I" at 9147.9,5947.59 h76
  text "H" at 9216.25,5947.59 h76
  text "T" at 9259.6,5947.59 h76
  text "I" at 9277.94,5947.59 h76
  text "W" at 9346.29,5947.59 h76
  text "E" at 9391.3,5947.59 h76
  text "R" at 9441.31,5947.59 h76
  text "E" at 9487.99,5947.59 h76
  text "H" at 9538,5947.59 h76
  text "DATE" at -4055,5870 h60
  text "REV" at -1635,5870 h60
  text "ZONE" at -1305,5870 h60
  text "E" at 7769.92,5867.57 h76
  text "R" at 7819.93,5867.57 h76
  text "A" at 7866.61,5867.57 h76
  text "S" at 7931.63,5867.57 h76
  text "T" at 7974.97,5867.57 h76
  text "H" at 8023.32,5867.57 h76
  text "G" at 8078.33,5867.57 h76
  text "I" at 8098.34,5867.57 h76
  text "R" at 8146.68,5867.57 h76
  text "O" at 8221.7,5867.57 h76
  text "N" at 8271.71,5867.57 h76
  text "." at 8310.06,5867.57 h76
  text "E" at 8356.73,5867.57 h76
  text "L" at 8395.08,5867.57 h76
  text "O" at 8450.09,5867.57 h76
  text "H" at 8498.43,5867.57 h76
  text "W" at 8566.78,5867.57 h76
  text "N" at 8633.47,5867.57 h76
  text "I" at 8653.47,5867.57 h76
  text "D" at 8721.82,5867.57 h76
  text "E" at 8768.5,5867.57 h76
  text "T" at 8811.85,5867.57 h76
  text "U" at 8861.86,5867.57 h76
  text "B" at 8908.54,5867.57 h76
  text "I" at 8928.54,5867.57 h76
  text "R" at 8976.89,5867.57 h76
  text "T" at 9019.54,5867.57 h76
  text "S" at 9066.22,5867.57 h76
  text "I" at 9084.55,5867.57 h76
  text "D" at 9134.57,5867.57 h76
  text "Y" at 9201.25,5867.57 h76
  text "L" at 9239.59,5867.57 h76
  text "E" at 9286.27,5867.57 h76
  text "E" at 9331.28,5867.57 h76
  text "R" at 9381.29,5867.57 h76
  text "F" at 9424.64,5867.57 h76
  text "E" at 9491.32,5867.57 h76
  text "B" at 9538,5867.57 h76
  text "APPROVED" at -4560,5865 h60
  text "DESCRIPTION" at -2650,5865 h60
  text "." at 7617.96,5787.55 h76
  text "N" at 7666.3,5787.55 h76
  text "E" at 7712.98,5787.55 h76
  text "V" at 7759.66,5787.55 h76
  text "I" at 7779.66,5787.55 h76
  text "G" at 7834.68,5787.55 h76
  text "E" at 7895.93,5787.55 h76
  text "E" at 7942.61,5787.55 h76
  text "T" at 7985.95,5787.55 h76
  text "N" at 8034.3,5787.55 h76
  text "A" at 8080.97,5787.55 h76
  text "R" at 8130.99,5787.55 h76
  text "A" at 8177.66,5787.55 h76
  text "W" at 8246.01,5787.55 h76
  text "D" at 8312.7,5787.55 h76
  text "E" at 8359.38,5787.55 h76
  text "I" at 8379.38,5787.55 h76
  text "L" at 8416.06,5787.55 h76
  text "P" at 8462.74,5787.55 h76
  text "M" at 8521.08,5787.55 h76
  text "I" at 8541.09,5787.55 h76
  text "R" at 8609.44,5787.55 h76
  text "O" at 8664.45,5787.55 h76
  text "S" at 8729.47,5787.55 h76
  text "S" at 8776.15,5787.55 h76
  text "E" at 8822.82,5787.55 h76
  text "R" at 8872.84,5787.55 h76
  text "P" at 8919.51,5787.55 h76
  text "X" at 8964.53,5787.55 h76
  text "E" at 9011.2,5787.55 h76
  text "R" at 9081.22,5787.55 h76
  text "O" at 9136.23,5787.55 h76
  text "D" at 9204.58,5787.55 h76
  text "E" at 9251.26,5787.55 h76
  text "V" at 9297.94,5787.55 h76
  text "R" at 9347.95,5787.55 h76
  text "E" at 9394.63,5787.55 h76
  text "S" at 9441.31,5787.55 h76
  text "E" at 9487.99,5787.55 h76
  text "R" at 9538,5787.55 h76
  text "ORIGINAL" at -2725,5735 h60
  text "A" at -1665,5735 h60
  text "D" at -5125,5027 h70
  text "D" at 9675,5027 h70
  text "C" at -5125,2647 h70
  text "C" at 9675,2647 h70
  text "B" at -5125,272 h70
  text "B" at 9675,272 h70
  text "DWG. NO." at -5165,-325.1 h30 r90
  text ".PCB_DWG_NO" at -5075,-540 h50 r90
  text "REV:" at -5165,-1335.1 h30 r90
  text ".PCB_REV" at -5075,-1350 h50 r90
  text ".PCB_PART_NUMBER" at 585,-1390 h45
  text "PART NO." at 900,-1390 h45
  text "UNLESS OTHERWISE SPECIFIED DIMENSIONS" at 880,-1495 h45
  text "DATE" at -1636,-1497.1 h45
  text "APPROVALS" at -776,-1497.1 h45
  text "2175 SALK AVENUE" at -3855,-1500 h45
  text "AND TOLERANCE ARE IN INCHES AND" at 825,-1570 h45
  text "DESIGNER:" at -456,-1577.1 h45
  text "SUITE 200" at -3855,-1590 h45
  text "APPLY TO THE FINISHED PART" at 715,-1640 h45
  text ".PCB_DESIGNER_APP_DATE" at -1508,-1657.1 h50
  text ".PCB_DESIGNER" at -778,-1657.1 h60
  text "CARLSBAD, CA 92008" at -3855,-1680.01 h45
  text "TOLERANCE ON:" at 475,-1765 h45
  text "USA" at -3855,-1770 h45
  text "ENGINEER:" at -456,-1777.1 h45
  text ".PCB_ENGINEER_APP_DATE" at -1508,-1847.1 h50
  text "ANGLES" at -110,-1855 h40
  text "3 DEC. PLACE" at 425,-1855 h40
  text "2 DEC. PLACE" at 880,-1855 h40
  text ".PCB_ENGINEER" at -778,-1857.1 h60
  text "TITLE:" at -1970,-1875 h45
  text "CHECKER:" at -456,-1977.1 h45
  text ".PCB_ANG_TOL" at -75,-2010 h60
  text ".PCB_3_DEC_TOL" at 390,-2010 h60
  text ".PCB_2_DEC_TOL" at 825,-2010 h60
  text ".PCB_TITLE_1" at -2145,-2025 h100
  text ".PCB_CHECKER_APP_DATE" at -1506,-2051.1 h50
  text ".PCB_CHECKER" at -778,-2057.1 h60
  text "THIRD ANGLE PROJECTION" at 1653,-2070.1 h40
  text "A" at -5125,-2098 h70
  text "A" at 9675,-2098 h70
  text "MATERIAL:" at 880,-2153.1 h45
  text "REFERENCE DOCUMENTS" at -836,-2197.1 h45
  text "BOM:" at -456,-2297.1 h45
  text ".PCB_TITLE_2" at -2140,-2320 h100
  text "SEE NOTES" at 514,-2352.1 h60
  text ".DOC_NO_BOM" at -776,-2387.1 h60
  text "ASSY DWG:" at -456,-2487.1 h45
  text ".DOC_NO_ASSY_DWG" at -776,-2577.1 h60
  text "REV:" at -4835,-2610 h45
  text "DWG NO:" at -3275,-2610 h45
  text "CAGE CODE:" at -2275,-2610 h45
  text "SIZE:" at -2030,-2610 h45
  text "FAB DWG:" at -456,-2677.1 h45
  text ".PCB_DWG_NO" at -3585,-2750 h100
  text ".PCB_REV" at -4865,-2755 h100
  text "B" at -2070,-2755 h100
  text ".DOC_NO_FAB_DWG" at -776,-2762.1 h60
  text ".CAGE_CODE" at -2445,-2765 h100
  text "SCHEMATIC:" at -456,-2867.1 h45
  text "PRINT DATE:" at 888,-2868.1 h45
  text "SHEET:" at -4315,-2925.1 h45
  text "FILE NAME:" at -2575,-2925.1 h45
  text "SCALE:" at -1970,-2925 h45
  text ".PRINT_DATE" at 480,-2937.1 h60
  text ".Printout_Name" at 9494,-2947 h150
  text ".DOC_NO_SCH_DWG" at -776,-2957.1 h60
  text ".PCB_FILE_NAME_NO_PATH" at -2918,-2970.1 h60
  text "OF" at -4765,-2975.1 h45
  text ".PCB_SCALE" at -2240,-2975 h60
  text "DOC-104 REV A" at 9550,-3042.1 h20
  text "1" at -3977,-3130 h70
  text "2" at -1472,-3130 h70
  text "3" at 1026.99,-3130 h70
  text "4" at 3533.66,-3130 h70
  text "5" at 6023,-3130 h70
  text "6" at 8518.66,-3130 h70